# Altium PCB OFP_SCM_v1.6.PcbDoc (part 1 of 3)
Units mil, origin at the board's own origin, x right, y up, seen from the top; angles counter-clockwise.
Board outline 4724.41 x 4330.71 mil, 2 copper layers (Top Layer, Bottom Layer), stack 62.256 mil thick; 103 components, 84 nets, 458 pads, 396 vias.
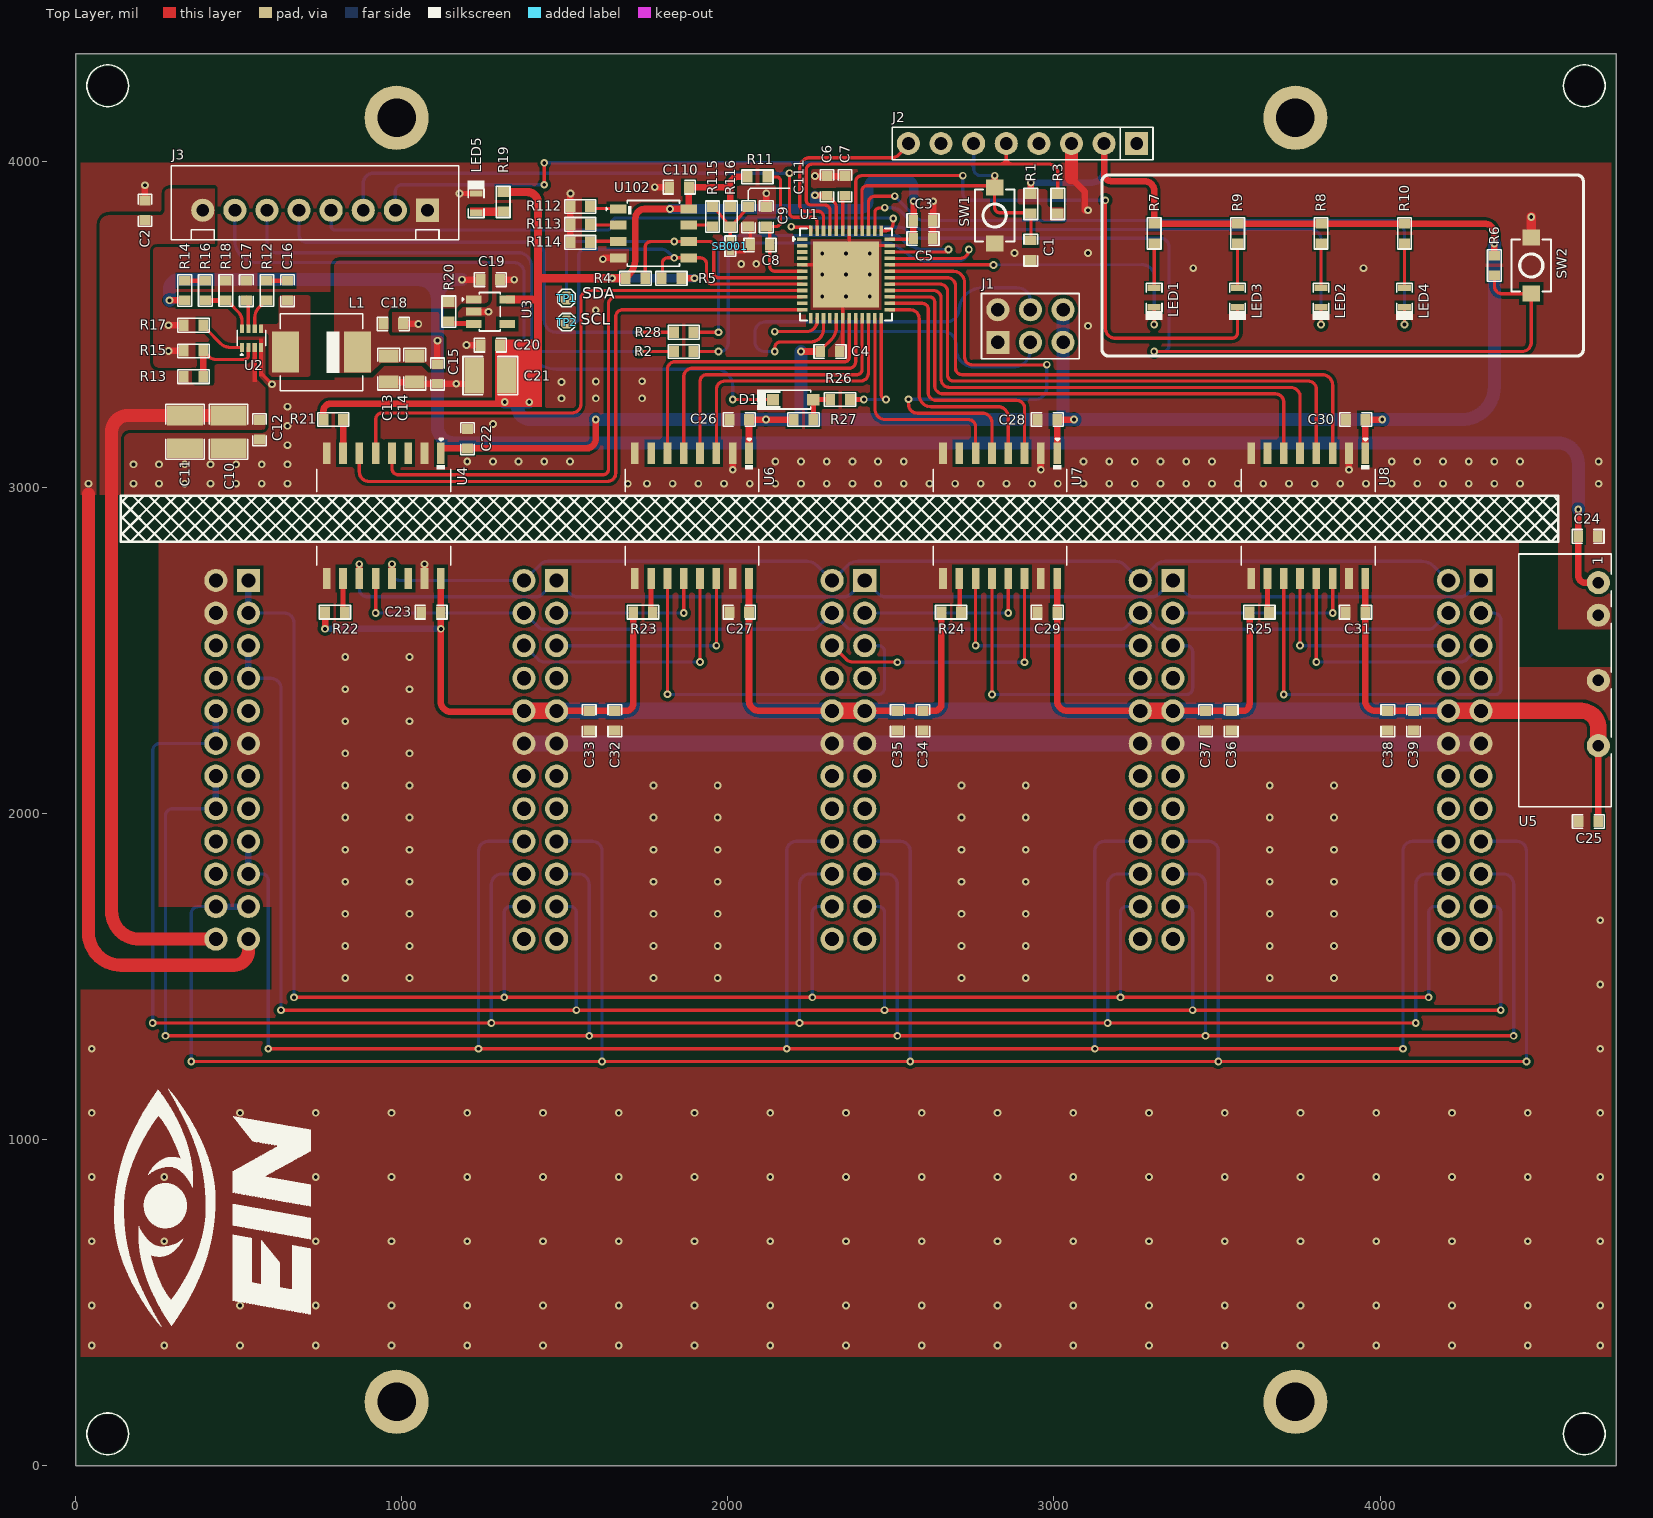
[diagram p0: Top Layer view]
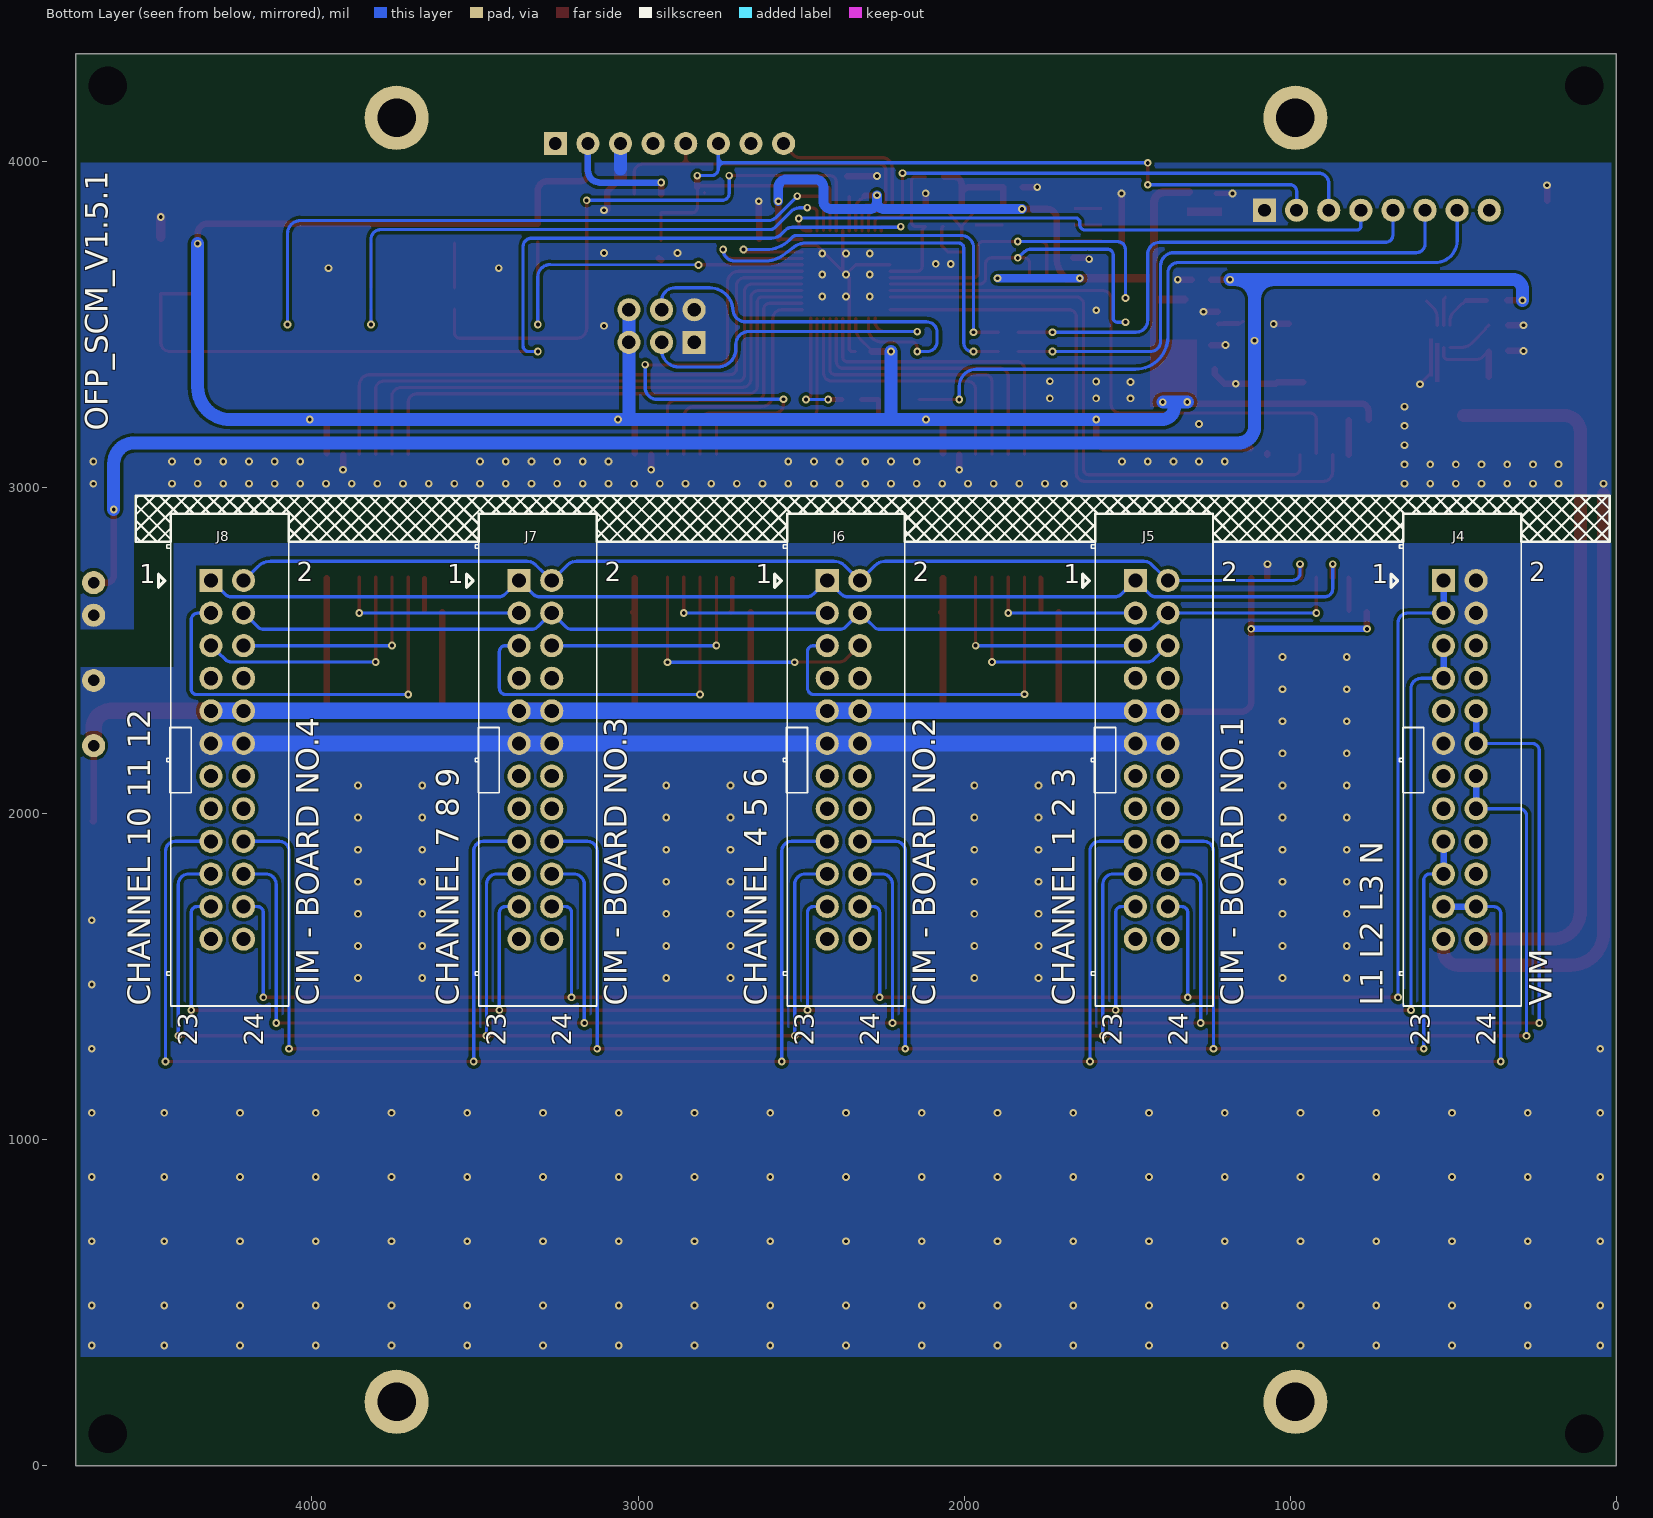
[diagram p1: Bottom Layer view, seen from below]
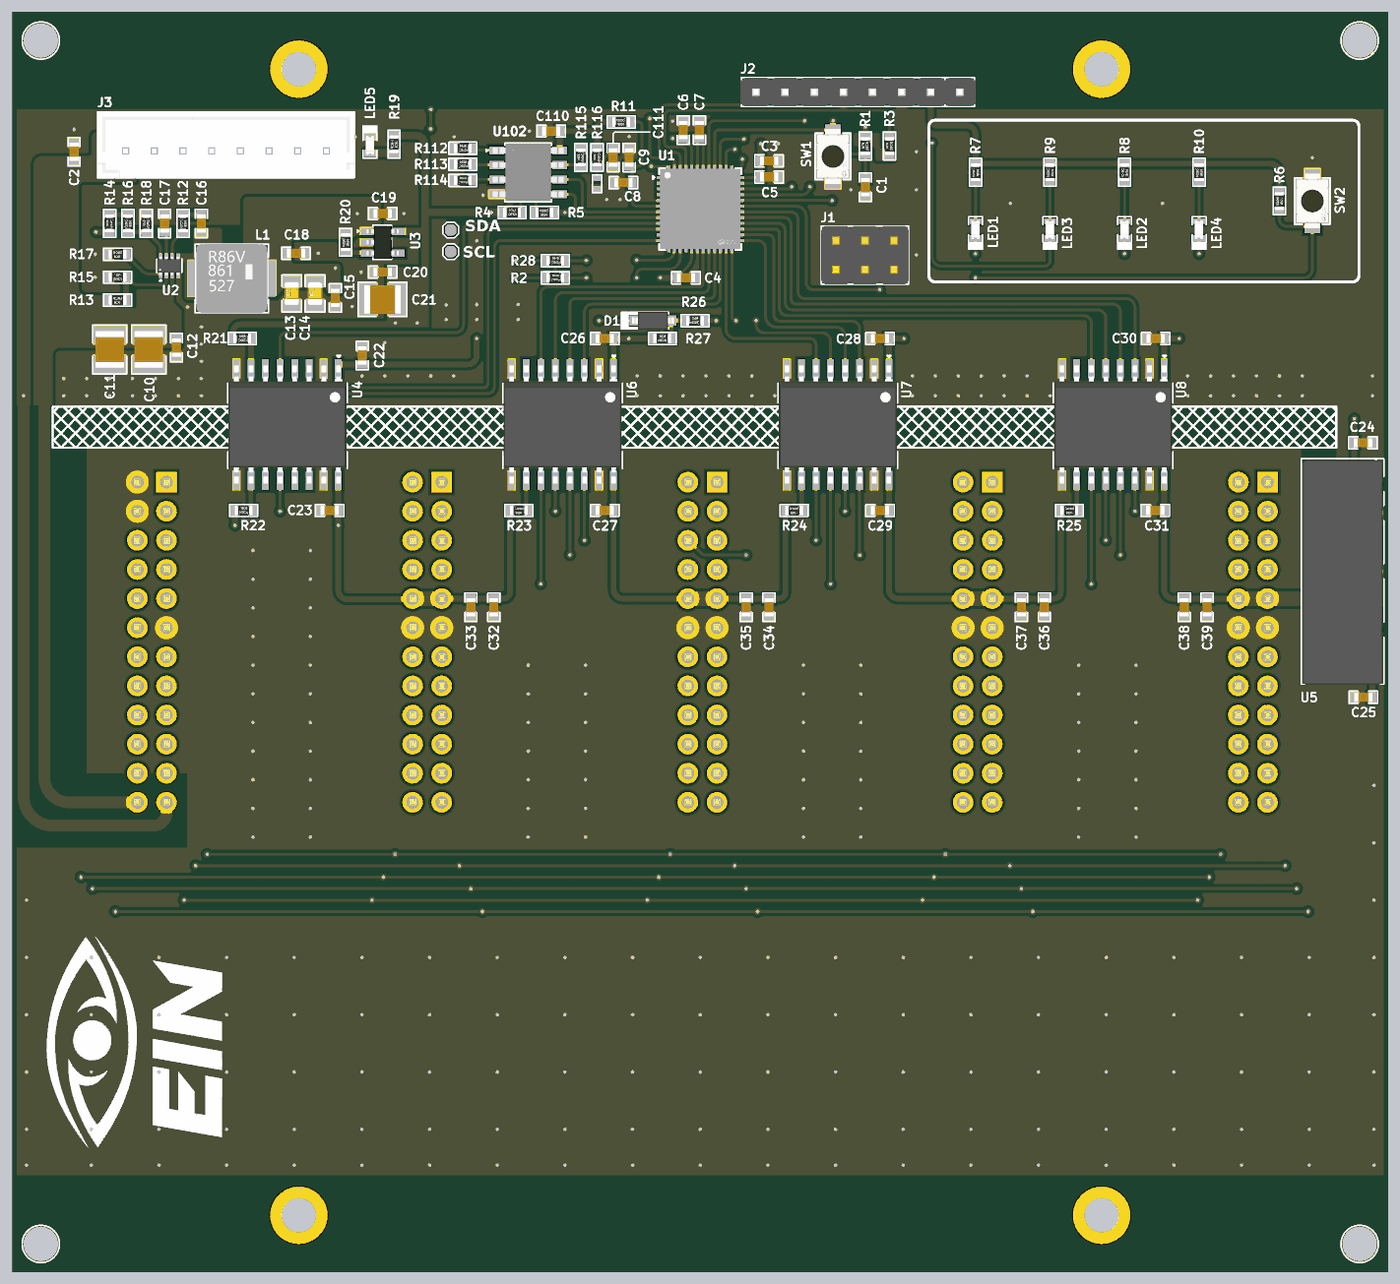
[diagram p3: 3D render of the assembled board from above, using the file's embedded part models]
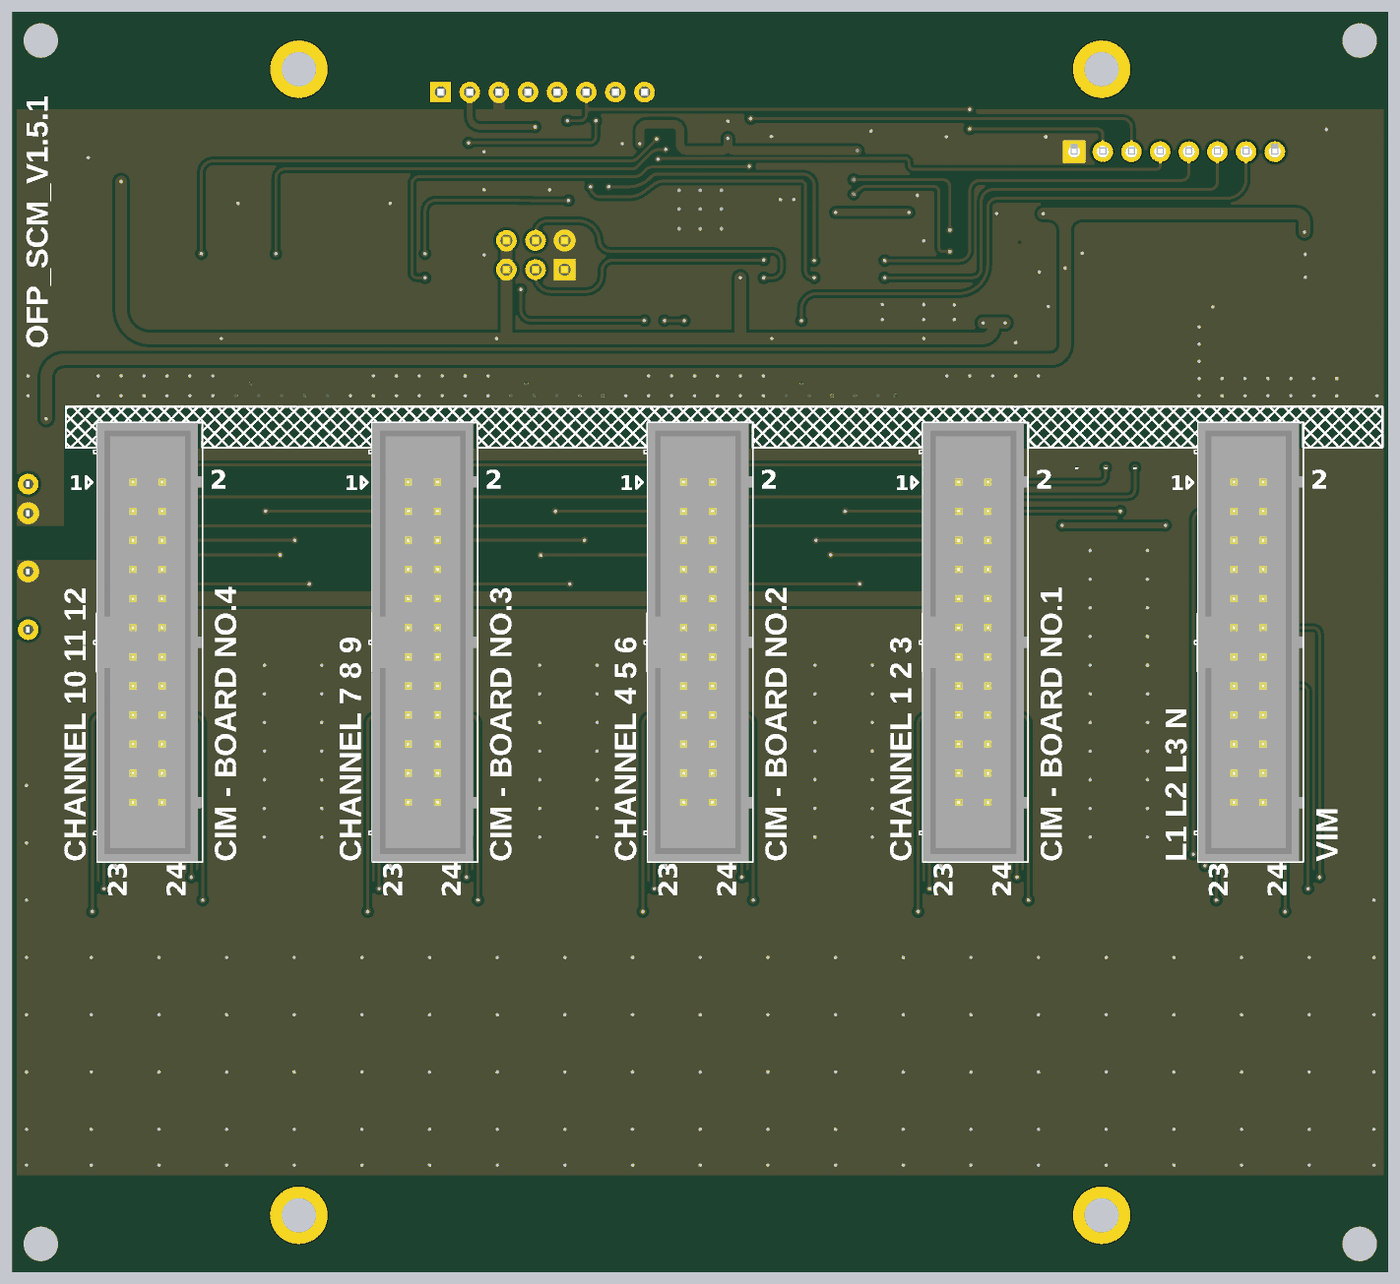
[diagram p4: 3D render of the assembled board from below, using the file's embedded part models]

## Layer stack, top to bottom
Top Solder: solder mask 0.4, Solder Resist, Dk 3.5
Top Layer: signal copper 1.378
Dielectric 1: dielectric 59.5, FR-4, Dk 4.8
Bottom Layer: signal copper 1.378
Bottom Solder: solder mask 0.4, Solder Resist, Dk 3.5

## Board outline
0,0 0,4330.71 4724.41,4330.71 4724.41,0

## Design rules (kind name [scope] priority, off if disabled: settings)
BoardOutlineClearance [All] p1: gap=0 ignorepadtopadclearanceinfootprint=FALSE except(15: Poly-OutlineEdge)
Clearance [All] p1: gap=10 ignorepadtopadclearanceinfootprint=FALSE except(6: SMDPad-SMDPad; 7: Arc-Arc Arc-Track Arc-SMDPad Arc-THPad Arc-Fill Track-Track Track-SMDPad Track-THPad Track-Fill SMDPad-Fill Fill-Fill)
ComponentClearance [All] p1: gap=0 collisioncheckmode=3 verticalgap=0 showdistances=FALSE
HoleSize [All] p1: absolutevalues=TRUE maxlimit=1000 minlimit=1 maxpercent=80.000 minpercent=20.000
HoleToHoleClearance [All] p1: gap=0 allowstackedmicrovias=TRUE
MinimumSolderMaskSliver [All] p1: minsoldermaskwidth=0
PolygonConnect [All] p1: connectstyle=Direct reliefconductorwidth=10 reliefentries=4 polygonreliefangle="90 Angle" airgapwidth=10
RoutingVias [All] p1: holewidth=11.81 width=23.62 viastyle="Through Hole" minholewidth=11.81 minwidth=23.62 maxholewidth=27.56 maxwidth=47.24
ShortCircuit "ShortCircuit - No NET" [InNet('No Net')] p1: allowed=TRUE
SilkToSilkClearance [All] p1: silktosilkclearance=0
SilkToSolderMaskClearance [IsPad] p1: minsilkscreentomaskgap=0 clearancetoexposedcopper=TRUE
SolderMaskExpansion [All] p1: expansion=4 istentingtop=FALSE
SupplyNets "Schematic Supply Nets_46" [InNet('VCORE')] p1: voltage=0.000
SupplyNets "Schematic Supply Nets_45" [InNet('GND')] p2: voltage=0.000
SupplyNets "Schematic Supply Nets_44" [InNet('VDD')] p3: voltage=0.000
SupplyNets "Schematic Supply Nets_43" [InNet('VDDA')] p4: voltage=0.000
SupplyNets "Schematic Supply Nets_42" [InNet('+5V')] p5: voltage=0.000
SupplyNets "Schematic Supply Nets_41" [InNet('VIN+')] p6: voltage=0.000
SupplyNets "Schematic Supply Nets_33" [InNet('VA_P')] p7: voltage=0.000
SupplyNets "Schematic Supply Nets_29" [InNet('VB_P')] p8: voltage=0.000
SupplyNets "Schematic Supply Nets_24" [InNet('VB_N')] p9: voltage=0.000
SupplyNets "Schematic Supply Nets_23" [InNet('VC_N')] p10: voltage=0.000
SupplyNets "Schematic Supply Nets_19" [InNet('VC_P')] p11: voltage=0.000
SupplyNets "Schematic Supply Nets_7" [InNet('VA_N')] p12: voltage=0.000
SupplyNets "Schematic Supply Nets_4" [InNet('NGND')] p13: voltage=0.000
SupplyNets "Schematic Supply Nets_1" [InNet('+3V3')] p14: voltage=0.000
Width [All] p1: maxlimit=100 minlimit=8 preferedwidth=15 minimp=50.000000 maximp=50.000000 favimp=50.000000
23 further rules are at their usual default settings.

## Classes and differential pairs
component class Power-Sheet: C10 C11 C12 C13 C14 C15 C16 C17 C18 C19 C20 C21 L1 LED5 R12 R13 R14 R15 R16 R17 R18 R19 R20 U2 U3
component class Microcontroller-Sheet: C1 C2 C3 C4 C5 C6 C7 C8 C9 D1 J1 J2 J3 LED1 LED2 LED3 LED4 R1 R2 R3 R4 R5 R6 R7 R8 R9 R10 R11 R26 R27 R28 SW1 SW2 TP1 TP2 U1
component class Isolation-Sheet: C22 C23 C24 C25 C26 C27 C28 C29 C30 C31 R21 R22 R23 R24 R25 U4 U5 U6 U7 U8
component class Board-Connectors: C32 C33 C34 C35 C36 C37 C38 C39 J4 J5 J6 J7 J8

## Components (designator, comment, footprint, x,y, rotation, side; value= is the part's Value field where it differs from the comment)
C1 "10uF" Cap-0603 2929.13,3728.35 r90 top locked
C2 "10uF" Cap-0603 212.6,3850.39 r270 top locked
C3 "10uF" Cap-0603 2598.42,3818.9 r180 top locked
C4 "0.1uF" Cap-0603 2313.15,3417.32 r180 top value=100nF
C5 "0.1uF" Cap-0603 2598.42,3763.78 r180 top locked value=100nF
C6 "0.1uF" Cap-0603 2303.96,3925.2 r270 top value=100nF
C7 "1uF" Cap-0603 2359.08,3925.2 r270 top
C8 "0.1uF" Cap-0603 2098.42,3744.09 r0 top locked value=100nF
C9 "10uF" Cap-0603 2118.11,3830.71 r270 top locked
C10 "10uF" Cap-1210 469.17,3171.1 r90 top locked
C11 "10uF" Cap-1210 335,3171.1 r90 top locked
C12 "0.1uF" Cap-0603 564,3177.1 r90 top value=100nF
C13 "22uF" Cap-0805 959.88,3363.39 r90 top locked
C14 "22uF" Cap-0805 1039.88,3363.39 r90 top locked
C15 "0.1uF" Cap-0603 1109.49,3348.27 r90 top locked value=100nF
C16 "0.1uF" Cap-0603 649.61,3604.17 r90 top locked value=100nF
C17 "33nF" Cap-0603 523.62,3604.17 r270 top locked
C18 "10uF" Cap-0603 974.25,3501.81 r180 top locked
C19 "0.1uF" Cap-0603 1271.65,3637.8 r180 top locked value=100nF
C20 "0.1uF" Cap-0603 1271.65,3437.01 r0 top locked value=100nF
C21 "100uF" Cap-1210 1271.65,3343.2 r0 top locked
C22 "0.1uF" Cap-0603 1201.65,3150 r270 top value=100nF
C23 "0.1uF" Cap-0603 1089.88,2618.11 r0 top value=100nF
C24 "10uF" Cap-0603 4637.61,2850.39 r180 top
C25 "4.7uF" Cap-0603 4638.73,1976.38 r0 top locked
C26 "0.1uF" Cap-0603 2034.76,3208.66 r0 top value=100nF
C27 "0.1uF" Cap-0603 2034.76,2618.11 r0 top locked value=100nF
C28 "0.1uF" Cap-0603 2979.65,3208.66 r0 top locked value=100nF
C29 "0.1uF" Cap-0603 2979.65,2618.11 r0 top locked value=100nF
C30 "0.1uF" Cap-0603 3925.53,3208.66 r0 top locked value=100nF
C31 "0.1uF" Cap-0603 3924.53,2618.11 r0 top locked value=100nF
C32 "10uF" Cap-0603 1653.54,2285.35 r90 top
C33 "0.1uF" Cap-0603 1574.8,2285.35 r90 top value=100nF
C34 "10uF" Cap-0603 2598.42,2285.35 r90 top
C35 "0.1uF" Cap-0603 2519.68,2285.35 r90 top value=100nF
C36 "10uF" Cap-0603 3543.31,2285.35 r90 top
C37 "0.1uF" Cap-0603 3464.57,2285.35 r90 top value=100nF
C38 "10uF" Cap-0603 4023.62,2285.35 r90 top
C39 "0.1uF" Cap-0603 4102.36,2285.35 r90 top value=100nF
C110 "0.1uF" Cap-0603 1850.39,3921.26 r180 top locked value=100nF (schematic designator C8)
C111 "0.1uF" Cap-0603 2062.99,3830.71 r270 top locked value=100nF (schematic designator C8)
D1 "1N5819HW-7-F" SOD-123 2200,3270 r180 top
J1 "X6521WV-2x03H-C60D30" X6521WV-2x03H-C60D30 2927.76,3495.37 r0 top
J2 "X6511WV-08H-C60D30" "HDR 1x8 TH male" 2903.54,4055.12 r180 top locked
J3 "B8B-XH-A(LF)(SN)" B8B-XH-A(LF)(SN) 734.25,3850.39 r180 top locked
J4 "X9555WV-2x12-6TV01" X9555WV-2x12-6TV01 479.92,2165.35 r270 bottom locked
J5 "X9555WV-2x12-6TV01" X9555WV-2x12-6TV01 1424.8,2165.35 r270 bottom locked
J6 "X9555WV-2x12-6TV01" X9555WV-2x12-6TV01 2369.68,2165.35 r270 bottom locked
J7 "X9555WV-2x12-6TV01" X9555WV-2x12-6TV01 3314.57,2165.35 r270 bottom locked
J8 "X9555WV-2x12-6TV01" X9555WV-2x12-6TV01 4259.45,2165.35 r270 bottom locked
L1 "6.8uH" ETQP3M6R8KVN 753.97,3415.2 r0 top locked value=45.6mR
LED1 "Blue" LED-0603 3307.09,3582.68 r270 top locked
LED2 "Blue" LED-0603 3818.9,3582.68 r270 top locked
LED3 "Blue" LED-0603 3562.99,3582.68 r270 top locked
LED4 "Blue" LED-0603 4074.8,3582.68 r270 top locked
LED5 "RED" LED-0603 1228.35,3872.2 r90 top locked
R1 "10K" Res-0603 2929.13,3870.08 r270 top locked
R2 "0R" Res-0603 1864.67,3417.32 r180 top
R3 "1K" Res-0603 3011.81,3870.08 r270 top locked
R4 "4.7K" Res-0603 1716.54,3641.73 r180 top locked
R5 "4.7K" Res-0603 1826.77,3641.73 r0 top locked
R6 "1K" Res-0603 4350.39,3681.1 r90 top locked
R7 "680R" Res-0603 3307.09,3779.53 r90 top locked
R8 "680R" Res-0603 3818.9,3779.53 r90 top locked
R9 "680R" Res-0603 3562.99,3779.53 r90 top locked
R10 "680R" Res-0603 4074.8,3779.53 r90 top locked
R11 "0R" Res-0603 2090.55,3952.76 r0 top
R12 "0R" Res-0603 586.61,3604.17 r90 top locked
R13 "511K" Res-0603 361.65,3340.39 r0 top locked value=511kR
R14 "49.9R" Res-0603 334.65,3604.17 r270 top locked
R15 "88.7K" Res-0603 361.65,3419.13 r180 top locked value=88.7kR
R16 "10.2K" Res-0603 397.64,3604.17 r90 top locked
R17 "0R" Res-0603 361.65,3497.87 r0 top locked
R18 "53.6K" Res-0603 460.63,3604.17 r270 top locked value=53.6kR
R19 "680R" Res-0603 1311.02,3876.2 r90 top locked
R20 "100K" Res-0603 1144.48,3539.37 r90 top value=100kR
R21 "4.7K" Res-0603 789.88,3208.66 r180 top locked
R22 "4.7K" Res-0603 794.88,2618.11 r180 top locked
R23 "4.7K" Res-0603 1739.76,2618.11 r0 top locked
R24 "4.7K" Res-0603 2684.65,2618.11 r0 top locked
R25 "4.7K" Res-0603 3629.53,2618.11 r0 top locked
R26 "0R" Res-0603 2344.08,3270 r180 top
R27 "10K" Res-0603 2232,3208.66 r180 top
R28 "1K" Res-0603 1864.67,3476.38 r180 top
R112 "4.7K" Res-0603 1547.24,3862.2 r180 top locked (schematic designator R4)
R113 "4.7K" Res-0603 1547.24,3807.08 r180 top locked (schematic designator R4)
R114 "4.7K" Res-0603 1547.24,3751.97 r180 top locked (schematic designator R4)
R115 "4.7K" Res-0603 1952.76,3830.71 r270 top locked (schematic designator R4)
R116 "4.7K" Res-0603 2007.88,3830.71 r270 top locked (schematic designator R4)
SB001 "Comment" "Solder Bridge 0402" 2007.88,3740.36 r270 top
SW1 "TS-1088-AR02016" TS-1088-AR02016 2817.83,3834.21 r270 top
SW2 "TS-1088-AR02016" TS-1088-AR02016 4463.5,3681.1 r270 top locked
TP1 "TEST POINT 0.5mm Dia" "Test-point - 0.5mm" 1505.4,3581.33 r180 top locked
TP2 "TEST POINT 0.5mm Dia" "Test-point - 0.5mm" 1505.4,3507.32 r180 top locked
U1 "ATSAMD20G17A-MU" "48-QFN (7x7)" 2362.2,3653.54 r0 top locked
U2 "TPS62933DRLR" SOT-583 539.37,3458.5 r90 top locked
U3 "RT9080-33GJ5" TSOT-23-5 1272.16,3539.37 r0 top locked
U4 "ISO7741DWR" SOIC-16-300mil 944.88,2913.39 r270 top locked
U5 "B0503S-2WR3" B0503S-2WR3 4669.29,2458.66 r270 top locked
U6 "ISO7740DWR" SOIC-16-300mil 1889.76,2913.39 r270 top locked
U7 "ISO7740DWR" SOIC-16-300mil 2834.65,2913.39 r270 top locked
U8 "ISO7740DWR" SOIC-16-300mil 3779.53,2913.39 r270 top locked
U102 "Comment" SOP-8 1771.65,3779.53 r0 top locked

## Footprints (in the part's own frame and the unit in brackets; to place one, negate y for a bottom-side part, rotate by r counter-clockwise, add the part's x,y. Pads: shape width x height; smd on the part's side, far side on the other; paste and mask are expansions set on the pad)
"48-QFN (7x7)" [mm]
  rect 0.79x0.28 smd paste-100 mask+0.051: 1(-3.407,2.75) 2(-3.407,2.25) 3(-3.407,1.75) 4(-3.407,1.25) 5(-3.407,0.75) 6(-3.407,0.25) 7(-3.407,-0.25) 8(-3.407,-0.75) 9(-3.407,-1.25) 10(-3.407,-1.75) 11(-3.407,-2.25) 12(-3.407,-2.75) 25(3.407,-2.75) 26(3.407,-2.25) 27(3.407,-1.75) 28(3.407,-1.25) 29(3.407,-0.75) 30(3.407,-0.25) 31(3.407,0.25) 32(3.407,0.75) 33(3.407,1.25) 34(3.407,1.75) 35(3.407,2.25) 36(3.407,2.75)
  rect 0.28x0.79 smd paste-100 mask+0.051: 13(-2.75,-3.407) 14(-2.25,-3.407) 15(-1.75,-3.407) 16(-1.25,-3.407) 17(-0.75,-3.407) 18(-0.25,-3.407) 19(0.25,-3.407) 20(0.75,-3.407) 21(1.25,-3.407) 22(1.75,-3.407) 23(2.25,-3.407) 24(2.75,-3.407) 37(2.75,3.407) 38(2.25,3.407) 39(1.75,3.407) 40(1.25,3.407) 41(0.75,3.407) 42(0.25,3.407) 43(-0.25,3.407) 44(-0.75,3.407) 45(-1.25,3.407) 46(-1.75,3.407) 47(-2.25,3.407) 48(-2.75,3.407)
  rect 5.15x5.15 smd paste-100 mask+0.051: 49(0,0)
  silkscreen extent -4.12,-3.58 3.58,3.58, body extent -3.5,-3.5 3.5,3.5, height 1
B8B-XH-A(LF)(SN) [mm]
  rect 1.8x1.8 hole 1: 1(-8.75,0)
  round 1.8 hole 1: 2(-6.25,0) 3(-3.75,0) 4(-1.25,0) 5(1.25,0) 6(3.75,0) 7(6.25,0) 8(8.75,0)
  silkscreen extent -11.2,-3.47 11.2,2.28, body extent -11.2,-3.47 11.2,2.28, height 7
B0503S-2WR3 [mm]
  round 1.8 hole 0.9 paste-2539.97 mask+0.05: 1(-6.35,0) 2(-3.81,0) 4(1.27,0) 6(6.35,0)
  silkscreen extent -8.58,-6.2 11.12,1, body extent -8.45,-6.08 11.15,0.92, height 10
Cap-0603 [mil]
  rect 30x35 smd mask+2.36: 1(-30,0) 2(30,0)
  silkscreen extent -49,-21 49,21, body extent -32,-16 31,16, height 34
Cap-0805 [mil] "SMD 0805"
  rect 40x60 smd mask+2.76: 1(-40,0) 2(40,0)
  silkscreen extent -64,-34 64,34, body extent -39,-25 39,25, height 30
Cap-1210 [mil] "SMD 1210"
  rect 60x110 smd: 1(-50,0) 2(50,0)
  silkscreen extent -84,-59 84,59, body extent -63,-49 63,49, height 39
ETQP3M6R8KVN [mm]
  rect 2.1x3.2 smd paste+0 mask+0.051: 1(-2.8,0) 2(2.8,0)
  silkscreen extent -3.2,-3 3.2,3, body extent -3.2,-3 3.2,3.01, height 3
"HDR 1x8 TH male" [mm]
  rect 1.8x1.8 hole 1 paste-2539.97 mask+0.051: 1(-8.89,0)
  round 1.8 hole 1 paste-2539.97 mask+0.051: 2(-6.35,0) 3(-3.81,0) 4(-1.27,0) 5(1.27,0) 6(3.81,0) 7(6.35,0) 8(8.89,0)
  silkscreen extent -10.16,-1.27 10.16,1.27, body extent -10.26,-1.25 10.27,1.25, height 8.5
LED-0603 [mm]
  rect 0.5x1 smd: 1(-0.75,0) 2(0.75,0)
  silkscreen extent -1.12,-0.66 1.75,0.66, body extent -0.82,-0.37 0.82,0.36, height 0.68
Res-0603 [mil]
  rect 30x35 smd: 1(-30,0) 2(30,0)
  silkscreen extent -48,-21 48,21, body extent -31,-17 31,17, height 18
SOD-123 [mm]
  rect 0.95x0.9 smd: 1(-1.575,0) 2(1.575,0)
  silkscreen extent -1.37,-0.8 2.82,0.8, body extent -1.82,-0.78 1.83,0.78, height 1.5
SOIC-16-300mil [mm]
  rect 1.65x0.6 smd paste+0 mask+0.07: 1(-4.875,4.445) 2(-4.875,3.175) 3(-4.875,1.905) 4(-4.875,0.635) 5(-4.875,-0.635) 6(-4.875,-1.905) 7(-4.875,-3.175) 8(-4.875,-4.445) 9(4.875,-4.445) 10(4.875,-3.175) 11(4.875,-1.905) 12(4.875,-0.635) 13(4.875,0.635) 14(4.875,1.905) 15(4.875,3.175) 16(4.875,4.445)
  silkscreen extent -6,4.12 -3.61,4.78, body extent -5.15,-5.15 5.15,5.15, height 2.65
"Solder Bridge 0402" [mil]
  rect 18x25 smd mask+2.17: 1(-18.5,0) 2(18.5,0)
  silkscreen extent -32,-17 32,16
SOP-8 [mm]
  rect 1.3x0.7 smd: 1(-2.75,1.905) 2(-2.75,0.635) 3(-2.75,-0.635) 4(-2.75,-1.905) 5(2.75,-1.905) 6(2.75,-0.635) 7(2.75,0.635) 8(2.75,1.905)
  silkscreen extent -3.69,-2.57 2.03,2.57, body extent -3.1,-2.5 3.1,2.5, height 1.76
SOT-583 [mm]
  rect 0.67x0.32 smd mask+0.055: 1(-0.735,0.75) 2(-0.735,0.25) 3(-0.735,-0.25) 4(-0.735,-0.75) 5(0.735,-0.75) 6(0.735,-0.25) 7(0.735,0.25) 8(0.735,0.75)
  silkscreen extent -1.32,-1.1 0.6,1.1, body extent -0.8,-1.05 0.8,1.05, height 0.6
"Test-point - 0.5mm" [mm]
  oct 1x1 smd: 1(0,0)
  silkscreen extent -0.68,-0.68 0.68,0.68
TS-1088-AR02016 [mm]
  rect 1.23x1.36 smd: 1(-2.185,0) 2(2.185,0)
  silkscreen extent -2.03,-1.54 2.03,1.54, body extent -2.4,-1.45 2.4,1.45, height 1.95
TSOT-23-5 [mm]
  rect 1.22x0.62 smd: 1(-1.31,0.95) 2(-1.31,0) 3(-1.31,-0.95) 4(1.31,-0.95) 5(1.31,0.95)
  silkscreen extent -2.21,-1.5 0.76,1.5, body extent -1.4,-1.45 1.4,1.45, height 0.95
X6521WV-2x03H-C60D30 [mm]
  rect 1.8x1.8 hole 1.05 paste-2539.97 mask+0.051: 1(-2.54,-1.27)
  round 1.8 hole 1.05 paste-2539.97 mask+0.051: 2(-2.54,1.27) 3(0,-1.27) 4(0,1.27) 5(2.54,-1.27) 6(2.54,1.27)
  silkscreen extent -3.81,-2.54 3.81,2.54, body extent -3.81,-2.54 3.81,2.54, height 8.5
X9555WV-2x12-6TV01 [mm]
  rect 1.8x1.8 hole 1.1: 1(-13.97,-1.27)
  round 1.8 hole 1.1: 2(-13.97,1.27) 3(-11.43,-1.27) 4(-11.43,1.27) 5(-8.89,-1.27) 6(-8.89,1.27) 7(-6.35,-1.27) 8(-6.35,1.27) 9(-3.81,-1.27) 10(-3.81,1.27) 11(-1.27,-1.27) 12(-1.27,1.27) 13(1.27,-1.27) 14(1.27,1.27) 15(3.81,-1.27) 16(3.81,1.27) 17(6.35,-1.27) 18(6.35,1.27) 19(8.89,-1.27) 20(8.89,1.27) 21(11.43,-1.27) 22(11.43,1.27) 23(13.97,-1.27) 24(13.97,1.27)
  silkscreen extent -19.18,-5.36 19.18,4.78, body extent -19.13,-4.4 19.12,4.7, height 9.2

## Part data
C1 C2 C3 C9 C18 C24 C32 C34 C36 C38: library part GRM188Z71A106KA73D, "CAP CER 10UF 10V X7R 0603", Case/Package=345Case, LCSC Part Number=C2959727, Manufacturer=Murata, Max Operating Temperature=125°C, Min Operating Temperature=-55°C, Tolerance=10%, Voltage Rating=10V, ComponentLink1Description=https://datasheet.octopart.com/GRM188Z71A106KA73D-Murata-datasheet-165579666.pdf?src-supplier=TME, ComponentLink1URL=https://datasheet.octopart.com/GRM188Z71A106KA73D-Murata-datasheet-165579666.pdf?src-supplier=TME, Height=1mm, Item Type=Capacitor, Length=1.6mm, Manufacturer Part Number=GRM188Z71A106KA73D, Material=4241ConductorMaterial, Pricing="1=0.36, 10=0.155, 50=0.155, 100=0.104, 1000=0.094, 10000=0.065 (USD)", RoHS=Yes, RoHS Compliant=Yes, Stock=390983, Supplier=Mouser, Thickness=800um, Width=800um
C4 C5 C6 C8 C12 C15 C16 C19 C20 C22 C23 C26 C27 C28 C29 C30 C31 C33 C35 C37 C39 C110 C111: library part GCJ188R71H104KA12D, "CAP CER 0.1UF 50V X7R 0603", Case Code (Imperial)=0603, Case Code (Metric)=1608, Dielectric=X7R, LCSC Part Number=C161115, Manufacturer=Murata, Max Operating Temperature=125°C, Min Operating Temperature=-55°C, Package Quantity=1, Ratings=AEC-Q200, Tolerance=10%, Voltage Rating=50V, Case/Package=0603, ComponentLink1Description=https://datasheet.ciiva.com/135/product-135604.pdf?src-supplier=Digikey, ComponentLink1URL=https://datasheet.ciiva.com/135/product-135604.pdf?src-supplier=Digikey, ComponentLink2Description=https://datasheet.ciiva.com/26889/getdatasheetpartid-369886-26889118.pdf?src-supplier=Verical, ComponentLink2URL=https://datasheet.ciiva.com/26889/getdatasheetpartid-369886-26889118.pdf?src-supplier=Verical, ComponentLink3Description=https://datasheet.ciiva.com/135/s0717e-135605.pdf?src-supplier=Digikey, ComponentLink3URL=https://datasheet.ciiva.com/135/s0717e-135605.pdf?src-supplier=Digikey, ComponentLink4Description=https://datasheet.ciiva.com/135/s0717e-135606.pdf?src-supplier=Digikey, ComponentLink4URL=https://datasheet.ciiva.com/135/s0717e-135606.pdf?src-supplier=Digikey, ComponentLink5Description=https://datasheet.ciiva.com/16440/c03e-16440425.pdf?src-supplier=Future+Electronics, ComponentLink5URL=https://datasheet.ciiva.com/16440/c03e-16440425.pdf?src-supplier=Future+Electronics, Construction=Flat, Depth=0.8mm, Features="Soft Termination", Height=0.8mm, Item Type=Capacitors, Lead Free=5697LeadFree, Length=1.6mm, Manufacturer Part Number=GCJ188R71H104KA12D, Material=4241ConductorMaterial, Mounting Technology="Surface Mount", Packaging="Tape and Reel", Pricing="1=0.13, 10=0.056, 50=0.056, 100=0.036, 1000=0.032, 10000=0.02 (USD)", Radiation Hardening=No, RoHS=Yes, RoHS Compliant=Yes, Series=GCJ, Stock=342536, Supplier=Mouser, Termination=SMD/SMT, Thickness=0.035inch, Voltage Rating (DC)=50V, Width=0.031inch
C7: library part CC0603KRX7R9BB105, "CAP CER 1UF 50V X7R 0603", Case Code (Imperial)=0603, Case Code (Metric)=1608, Dielectric=X7R, LCSC Part Number=C559769, Manufacturer=Yageo, Max Operating Temperature=125°C, Min Operating Temperature=-55°C, Package Quantity=4000, Tolerance=10%, Voltage Rating=50V, Case/Package=0603, ComponentLink1Description=http://www.mouser.com/ds/2/447/Yageo_UPY-GP_NP0_16V-to-50V_9-358835.pdf?src-supplier=Mouser, ComponentLink1URL=http://www.mouser.com/ds/2/447/Yageo_UPY-GP_NP0_16V-to-50V_9-358835.pdf?src-supplier=Mouser, ComponentLink2Description=http://www.yageo.com/documents/recent/UPY-GPHC_X7R_6.3V-to-50V_18.pdf?src-supplier=Digikey, ComponentLink2URL=http://www.yageo.com/documents/recent/UPY-GPHC_X7R_6.3V-to-50V_18.pdf?src-supplier=Digikey, ComponentLink3Description=https://datasheet.octopart.com/CC0603KRX7R9BB105-Yageo-datasheet-137700082.pdf?src-supplier=Future+Electronics, ComponentLink3URL=https://datasheet.octopart.com/CC0603KRX7R9BB105-Yageo-datasheet-137700082.pdf?src-supplier=Future+Electronics, Halogen Free=5694HalogenFree, Height=900um, Item Type=Capacitors, Lead Free="Lead Free", Length=0.063inch, Manufacturer Part Number=CC0603KRX7R9BB105, Material=4241ConductorMaterial, Mounting Technology="Surface Mount", Packaging="Tape and Reel", RoHS=Yes, RoHS Compliant=Yes, Series=CC, Stock=950, Supplier=Rs, Termination=SMD/SMT, Thickness=0.035inch, Voltage Rating (DC)=50V, Weight=7.1E-05oz, Width=0.031inch
C10 C11: library part GRM32ER71H106KA12L, "CAP CER 10UF 50V X7R 1210", LCSC Part Number=C77102, Manufacturer=Murata, ComponentLink1Description=https://datasheet.ciiva.com/16497/product-16497010.pdf?src-supplier=Future+Electronics, ComponentLink1URL=https://datasheet.ciiva.com/16497/product-16497010.pdf?src-supplier=Future+Electronics, ComponentLink2Description=https://datasheet.ciiva.com/3777/4286grm32er71h106ka1223-3777306.pdf?src-supplier=Arrow+Electronics, ComponentLink2URL=https://datasheet.ciiva.com/3777/4286grm32er71h106ka1223-3777306.pdf?src-supplier=Arrow+Electronics, ComponentLink3Description=https://datasheet.ciiva.com/11789/0900766b80ef921d-11789081.pdf?src-supplier=Rs, ComponentLink3URL=https://datasheet.ciiva.com/11789/0900766b80ef921d-11789081.pdf?src-supplier=Rs, ComponentLink4Description=https://datasheet.ciiva.com/11607/c02e-11607596.pdf?src-supplier=Avnet, ComponentLink4URL=https://datasheet.ciiva.com/11607/c02e-11607596.pdf?src-supplier=Avnet, ComponentLink5Description=https://datasheet.ciiva.com/6270/partnumbering-e-01-6270167.pdf?src-supplier=Digikey, ComponentLink5URL=https://datasheet.ciiva.com/6270/partnumbering-e-01-6270167.pdf?src-supplier=Digikey, ComponentLink6Description=https://datasheet.ciiva.com/6270/partnumbering-e-01-6270168.pdf?src-supplier=Digikey, ComponentLink6URL=https://datasheet.ciiva.com/6270/partnumbering-e-01-6270168.pdf?src-supplier=Digikey, ComponentLink7Description=https://datasheet.ciiva.com/6270/partnumbering-e-01-6270169.pdf?src-supplier=Digikey, ComponentLink7URL=https://datasheet.ciiva.com/6270/partnumbering-e-01-6270169.pdf?src-supplier=Digikey, ComponentLink8Description=https://datasheet.ciiva.com/46441/1754714-46441340.pdf?src-supplier=Element14, ComponentLink8URL=https://datasheet.ciiva.com/46441/1754714-46441340.pdf?src-supplier=Element14, Item Type=Capacitors, Lead Free=5697LeadFree, Manufacturer Part Number=GRM32ER71H106KA12L, Pricing="1000=0.325, 2000=0.32, 3000=0.315, 4000=0.315, 5000=0.305 (USD)", RoHS=Yes, RoHS Compliant=5897YesNo, Stock=960000, Supplier="Future Electronics"
C13 C14: library part GRM21BZ71A226ME15L, "CAP CER 22UF 10V X7R 0805", LCSC Part Number=C907991, Manufacturer=Murata, Max Operating Temperature=125°C, Min Operating Temperature=-55°C, Package=0805, Supplier Part Number=490-GRM21BZ71A226ME15LCT-ND, Tolerance=20%, Voltage Rating=10V, Category="Ceramic Capacitors", ComponentLink1Description=https://datasheet.octopart.com/GRM21BZ71A226ME15L-Murata-datasheet-165579666.pdf?src-supplier=TME, ComponentLink1URL=https://datasheet.octopart.com/GRM21BZ71A226ME15L-Murata-datasheet-165579666.pdf?src-supplier=TME, ComponentLink2Description=LCSC, ComponentLink2URL=https://www.lcsc.com/product-detail/Multilayer-Ceramic-Capacitors-MLCC-SMD-SMT_Murata-Electronics-GRM21BZ71A226ME15L_C907991.html, Height=1.45mm, Item Type=Capacitor, Length=2mm, Manufacturer Part Number=GRM21BZ71A226ME15L, Material=4241ConductorMaterial, Pricing="1=0.39, 10=0.259, 50=0.191, 100=0.1556, 500=0.12282, 1000=0.10372 (USD)", RoHS=Yes, Stock=49126, Supplier=Digi-Key, Thickness=1.25mm, Width=1.25mm
C17: library part GCJ188R71H333KA12D, "CAP CER 0.033UF 50V X7R 0603", Case Code (Imperial)=0603, Case Code (Metric)=1608, Dielectric=X7R, LCSC Part Number=C2173059, Manufacturer=Murata, Max Operating Temperature=125°C, Min Operating Temperature=-55°C, Package Quantity=1, Ratings=AEC-Q200, Tolerance=10%, Voltage Rating=50V, Case/Package=0603, ComponentLink1Description=https://datasheet.ciiva.com/168/product-168891.pdf?src-supplier=Digikey, ComponentLink1URL=https://datasheet.ciiva.com/168/product-168891.pdf?src-supplier=Digikey, ComponentLink2Description=https://datasheet.ciiva.com/168/s0717e-168892.pdf?src-supplier=Digikey, ComponentLink2URL=https://datasheet.ciiva.com/168/s0717e-168892.pdf?src-supplier=Digikey, ComponentLink3Description=https://datasheet.ciiva.com/168/s0717e-168893.pdf?src-supplier=Digikey, ComponentLink3URL=https://datasheet.ciiva.com/168/s0717e-168893.pdf?src-supplier=Digikey, Depth=0.8mm, Features="Soft Termination", Item Type=Capacitors, Lead Free="Lead Free", Length=1.6mm, Manufacturer Part Number=GCJ188R71H333KA12D, Mounting Technology="Surface Mount", Packaging="Tape and Reel", Pricing="1=0.18, 10=0.072, 50=0.072, 100=0.047, 1000=0.039, 10000=0.027 (USD)", RoHS=Yes, RoHS Compliant=Yes, Series=GCJ, Stock=15481, Supplier=Mouser, Termination=SMD/SMT, Thickness=0.031inch, Voltage Rating (DC)=50V, Width=0.031inch
C21: library part CC1210MKX5R5BB107, "CAP CER 100UF 6.3V X5R 1210", Case Code (Imperial)=1210, Case Code (Metric)=3225, Dielectric=X5R, LCSC Part Number=C326605, Manufacturer=Yageo, Max Operating Temperature=85°C, Min Operating Temperature=-55°C, Tolerance=20%, Voltage Rating=6.3V, Case/Package=1210, ComponentLink1Description=http://www.mouser.com/ds/2/447/Yageo_UPY-GP_NP0_16V-to-50V_9-358835.pdf?src-supplier=Mouser, ComponentLink1URL=http://www.mouser.com/ds/2/447/Yageo_UPY-GP_NP0_16V-to-50V_9-358835.pdf?src-supplier=Mouser, ComponentLink2Description=https://www.verical.com/server-webapp/html/getDatasheet?partID=557130&src-supplier=Verical, ComponentLink2URL=https://www.verical.com/server-webapp/html/getDatasheet?partID=557130&src-supplier=Verical, ComponentLink3Description=http://www.yageo.com/documents/recent/UPY-GPHC_X5R_4V-to-50V_25.pdf?src-supplier=Digikey, ComponentLink3URL=http://www.yageo.com/documents/recent/UPY-GPHC_X5R_4V-to-50V_25.pdf?src-supplier=Digikey, ComponentLink4Description=http://www.yageo.com/documents/recent/UPY-GPHC_X5R_4V-to-50V_12.pdf?src-supplier=Avnet, ComponentLink4URL=http://www.yageo.com/documents/recent/UPY-GPHC_X5R_4V-to-50V_12.pdf?src-supplier=Avnet, Depth=2.5mm, Halogen Free="Halogen Free", Height=2.5mm, Item Type=Capacitors, Lead Free="Lead Free", Length=3.2mm, Manufacturer Part Number=CC1210MKX5R5BB107, Mounting Technology="Surface Mount", Packaging="Tape and Reel", Pricing="500=0.199, 1500=0.195, 2000=0.193, 5000=0.19, 7500=0.187 (USD)", Radiation Hardening=No, RoHS=Yes, RoHS Compliant=Yes, Series=CC, Stock=155500, Supplier="Future Electronics", Termination=SMD/SMT, Thickness=0.11inch, Voltage Rating (DC)=6.3V, Weight=0.000564oz, Width=0.098inch
C25: library part GRM188Z71A475KE15D, "CAP CER 4.7UF 10V X7R 0603", Case/Package=0603, LCSC Part Number=C913474, Manufacturer=Murata, Max Operating Temperature=125°C, Min Operating Temperature=-55°C, Tolerance=10%, Voltage Rating=10V, ComponentLink1Description=https://datasheet.octopart.com/GRM188Z71A475KE15D-Murata-datasheet-149523299.pdf?src-supplier=Newark, ComponentLink1URL=https://datasheet.octopart.com/GRM188Z71A475KE15D-Murata-datasheet-149523299.pdf?src-supplier=Newark, ComponentLink2Description=https://datasheet.octopart.com/GRM188Z71A475KE15D-Murata-datasheet-165579666.pdf?src-supplier=TME, ComponentLink2URL=https://datasheet.octopart.com/GRM188Z71A475KE15D-Murata-datasheet-165579666.pdf?src-supplier=TME, Height=950um, Item Type=Capacitors, Length=1.6mm, Manufacturer Part Number=GRM188Z71A475KE15D, Material=4241ConductorMaterial, Pricing="1=0.24, 10=0.1, 50=0.1, 100=0.063, 1000=0.055, 10000=0.041 (USD)", RoHS=Yes, RoHS Compliant=Yes, Stock=33218, Supplier=Mouser, Thickness=800um, Width=800um
D1: "DIODE SCHOTTKY 40V 1A SOD123", Average Rectified Current=1A, Capacitance=110pF, Case/Package=SOD-123-2, Forward Voltage=450mV, LCSC Part Number=C82544, Manufacturer=Diodes, Max Forward Surge Current (Ifsm)=25A, Max Operating Temperature=125°C, Max Power Dissipation=450mW, Max Repetitive Reverse Voltage (Vrrm)=40V, Max Reverse Current=50uA, Min Operating Temperature=-65°C, Package Quantity=3000, Supplier Part Number 1=1N5819HW-FDICT-ND, Category="Schottky Diodes", ComponentLink1Description=https://datasheet.ciiva.com/16303/ds30217-16303296.pdf?src-supplier=Future+Electronics, ComponentLink1URL=https://datasheet.ciiva.com/16303/ds30217-16303296.pdf?src-supplier=Future+Electronics, ComponentLink2Description=https://datasheet.ciiva.com/27092/1538419-27092484.pdf?src-supplier=Jameco, ComponentLink2URL=https://datasheet.ciiva.com/27092/1538419-27092484.pdf?src-supplier=Jameco, ComponentLink3Description=https://datasheet.ciiva.com/912/ds30217-912801.pdf?src-supplier=Digi-Key, ComponentLink3URL=https://datasheet.ciiva.com/912/ds30217-912801.pdf?src-supplier=Digi-Key, ComponentLink4Description=https://datasheet.ciiva.com/1177/ds30217-1177089.pdf?src-supplier=Element14, ComponentLink4URL=https://datasheet.ciiva.com/1177/ds30217-1177089.pdf?src-supplier=Element14, ComponentLink5Description=https://datasheet.ciiva.com/912/ds30217-912802.pdf?src-supplier=Digi-Key, ComponentLink5URL=https://datasheet.ciiva.com/912/ds30217-912802.pdf?src-supplier=Digi-Key, ComponentLink6Description=https://datasheet.ciiva.com/912/ds30217-912803.pdf?src-supplier=Digi-Key, ComponentLink6URL=https://datasheet.ciiva.com/912/ds30217-912803.pdf?src-supplier=Digi-Key, ComponentLink7Description=https://datasheet.ciiva.com/8303/ds30217-8303132.pdf?src-supplier=Avnet, ComponentLink7URL=https://datasheet.ciiva.com/8303/ds30217-8303132.pdf?src-supplier=Avnet, ComponentLink8Description=https://datasheet.ciiva.com/25919/ds30217-25919644.pdf?src-supplier=Avnet+Europe, ComponentLink8URL=https://datasheet.ciiva.com/25919/ds30217-25919644.pdf?src-supplier=Avnet+Europe, Contact Plating=Tin,Matte, Current Rating=1A, Element Configuration=Single, Forward Current=1A, Height=1.25mm, Item Type=Diode, Lead Free="Lead Free", Length=2.85mm, Manufacturer Part Number=1N5819HW-7-F, Max Reverse Voltage (DC)=40V, Number of Pins=2, Output Current=1A, Packaging="Tape and Reel", Peak Non-Repetitive Surge Current=25A, Polarity=Standard, Pricing 1="1=0.46000, 10=0.34500, 100=0.19530, 500=0.12936, 1000=0.09918 (USD)", Radiation Hardening=No, REACH SVHC="No SVHC", RoHS=Yes, RoHS Compliant=Yes, Series=-, Supplier 1=Digi-Key, Termination=SMD/SMT, Voltage Rating (DC)=40V, Weight=0.000353oz, Width=1.7mm
J1: "Gold 250V 3A Policy 2.5mm 6P -40℃~+105℃ 2.54mm Double Row Black Brass 2x3P 2.54mm Plugin,P=2.54mm Pin Headers ROHS", LCSC Part Number=C706893, Manufacturer=XKB, Package=Plugin,P=2.54mm, ComponentLink1Description=LCSC, ComponentLink1URL=https://www.lcsc.com/product-detail/Pin-Headers_XKB-Connection-X6521WV-2x03H-C60D30_C706893.html, Item Type="Male Pin Header", Manufacturer Part Number=X6521WV-2x03H-C60D30
J2: "Gold 250V 3A Square Pins 2.5mm 8P 260℃ 6mm -40℃~+105℃ 3mm 2.54mm Plugin Black Brass 2.54mm 1x8P Plugin,P=2.54mm Pin Headers ROHS", LCSC Part Number=C706880, Manufacturer=XKB, Package=Plugin,P=2.54mm, ComponentLink1Description=LCSC, ComponentLink1URL=https://www.lcsc.com/product-detail/Pin-Headers_XKB-Connection-X6511WV-08H-C60D30_C706880.html, Item Type="Male Header", Manufacturer Part Number=X6511WV-08H-C60D30
J3: "CONN HEADER VERT 8POS 2.5MM", Color=Natural, Contact Resistance=20mR, Current Rating=3A, Housing Color=White, Insulation Resistance=1GR, LCSC Part Number=C157972, Manufacturer=JST, Max Operating Temperature=85°C, Max Voltage Rating (AC)=250V, Min Operating Temperature=-25°C, ComponentLink1Description=https://datasheet.ciiva.com/11747/0900766b80826540-11747580.pdf?src-supplier=Rs, ComponentLink1URL=https://datasheet.ciiva.com/11747/0900766b80826540-11747580.pdf?src-supplier=Rs, ComponentLink2Description=https://datasheet.ciiva.com/26894/getdatasheetpartid-440408-26894817.pdf?src-supplier=Verical, ComponentLink2URL=https://datasheet.ciiva.com/26894/getdatasheetpartid-440408-26894817.pdf?src-supplier=Verical, Contact Material=Brass, Contact Plating=Tin,Lead,Copper, Contact Type="Male Pin", Depth=5.75mm, Fastening Type=Detent, Housing Material=Polyamide, Item Type="Wire to Board Connector", Lead Free=5697LeadFree, Lead Pitch=2.5mm, Length=22.4mm, Manufacturer Part Number=B8B-XH-A(LF)(SN), Max Current Rating=3A, Mounting Technology="Through Hole", Number of Contacts=8, Number of Positions=8, Number of Rows=1, Orientation=Straight, Packaging=Bulk, Pitch=2.5mm, Reach SVHC Compliant=No, RoHS=Yes, Series=XH, Stock=14940, Supplier=Rs, Termination=Press-Fit, Voltage Rating=250V, Voltage Rating (AC)=250V, Weight=28.349523g, Wire/Cable Gauge=22AWG
J4 J5 J6 J7 J8: "2x12P 24P 2 Tin 2.54mm 2.54mm 12 3A Brass Direct Insert Plugin,P=2.54mm Wire To Board Connector ROHS", LCSC Part Number=C692425, Manufacturer="XKB Connectivity", Item Type="Wire to Board Connector", Manufacturer Part Number=X9555WV-2x12-6TV01, Pricing="5=0.315, 50=0.2544, 250=0.2058, 500=0.1734, 2000=0.1589, 5000=0.1503 (USD)", RoHS=No, Supplier=LCSC
L1: library part ETQ-P3M6R8KVN, "FIXED IND 6.8UH 4.5A 50.16 MOHM", LCSC Part Number=C412310, Manufacturer=Panasonic, ComponentLink1Description=http://www.farnell.com/datasheets/2820815.pdf?src-supplier=Farnell, ComponentLink1URL=http://www.farnell.com/datasheets/2820815.pdf?src-supplier=Farnell, ComponentLink2Description=https://industrial.panasonic.com/cdbs/www-data/pdf/AGL0000/AGL0000C63.pdf?src-supplier=Digikey, ComponentLink2URL=https://industrial.panasonic.com/cdbs/www-data/pdf/AGL0000/AGL0000C63.pdf?src-supplier=Digikey, ComponentLink3Description=https://datasheet.octopart.com/ETQ-P3M6R8KVN-Panasonic-datasheet-136412728.pdf?src-supplier=Element14, ComponentLink3URL=https://datasheet.octopart.com/ETQ-P3M6R8KVN-Panasonic-datasheet-136412728.pdf?src-supplier=Element14, Item Type=Inductors, Manufacturer Part Number=ETQ-P3M6R8KVN, Pricing="1=0.84, 10=0.609, 50=0.609, 100=0.502, 1000=0.405, 10000=0.344 (USD)", RoHS=Yes, Stock=4626, Supplier=Mouser
LED1 LED2 LED3 LED4: library part NCD0603B3, "blue 0603 Light Emitting Diodes (LED) ROHS", LCSC Part Number=C158101, Manufacturer="Foshan NationStar Optoelectronics", Package=0603, ComponentLink1Description=LCSC, ComponentLink1URL=https://www.lcsc.com/product-detail/Light-Emitting-Diodes-LED_Foshan-NationStar-Optoelectronics-NCD0603B3_C158101.html, Item Type=LED, Manufacturer Part Number=NCD0603B3
LED5: library part NCD0603R3, "RED LED 0603 Light Emitting Diodes", LCSC Part Number=C3151730, Manufacturer="Foshan NationStar Optoelectronics", Package=0603, ComponentLink1Description=LCSC, ComponentLink1URL=https://www.lcsc.com/product-detail/Light-Emitting-Diodes-LED_Foshan-NationStar-Optoelectronics-NCD0603R3_C3151730.html, Item Type=LED, Manufacturer Part Number=NCD0603R3
R1 R27: library part RC0603FR-0710KL, "RES SMD 10K Ohm 1% 1/10W 0603", Case Code (Imperial)=0603, Case Code (Metric)=1608, LCSC Part Number=C98220, Manufacturer=Yageo, Max Operating Temperature=155°C, Max Power Dissipation=100mW, Min Operating Temperature=-55°C, Resistance=10kR, Resistance Tolerance=1%, Resistor Type="Thick Film", Supplier Part Number 1=311-10.0KHRCT-ND, Temperature Coefficient=100ppm/°C, Voltage Rating=75V, Voltage Rating (DC)=50V, Case/Package=0603, Category="Chip SMD Resistors", ComponentLink1Description=https://datasheet.ciiva.com/7660/38590-7660789.pdf?src-supplier=Element14, ComponentLink1URL=https://datasheet.ciiva.com/7660/38590-7660789.pdf?src-supplier=Element14, ComponentLink2Description=https://datasheet.ciiva.com/7983/443971-7983596.pdf?src-supplier=Element14, ComponentLink2URL=https://datasheet.ciiva.com/7983/443971-7983596.pdf?src-supplier=Element14, ComponentLink3Description=https://datasheet.ciiva.com/22747/443971-22747519.pdf?src-supplier=Element14, ComponentLink3URL=https://datasheet.ciiva.com/22747/443971-22747519.pdf?src-supplier=Element14, ComponentLink4Description=https://datasheet.ciiva.com/46440/1868787-46440891.pdf?src-supplier=Element14, ComponentLink4URL=https://datasheet.ciiva.com/46440/1868787-46440891.pdf?src-supplier=Element14, ComponentLink5Description=https://datasheet.ciiva.com/7746/1738695-7746239.pdf?src-supplier=Element14, ComponentLink5URL=https://datasheet.ciiva.com/7746/1738695-7746239.pdf?src-supplier=Element14, ComponentLink6Description=https://datasheet.ciiva.com/15189/getdatasheetpartid-409289-15189591.pdf?src-supplier=Verical, ComponentLink6URL=https://datasheet.ciiva.com/15189/getdatasheetpartid-409289-15189591.pdf?src-supplier=Verical, Construction=Rectangular, Depth=0.8mm, Features="Moisture Resistant", Height=0.45mm, Item Type=Resistor, Lead Free="Lead Free", Lead Pitch=0.3mm, Length=1.6mm, Manufacturer Part Number=RC0603FR-0710KL, Military Standard=Not, Number of Pins=2, Number of Terminations=2, Packaging="Tape and Reel", Power Rating=100mW, Pricing 1="1=0.10000, 10=0.02400, 100=0.00970, 1000=0.00436, 2500=0.00378 (USD)", REACH SVHC=Unknown, RoHS=Yes, RoHS Compliant=Yes, Series=RC, Size Code=0603, Stock 1=25249139, Supplier 1=Digi-Key, Termination=SMD/SMT, Tolerance=1%, Weight=7.1E-05oz, Width=0.8mm
R2 R26: library part RC0603JR-070RL, "RES 0 OHM JUMPER 1/10W 0603", Case Code (Imperial)=0603, Case Code (Metric)=1608, LCSC Part Number=C95177, Manufacturer=Yageo, Max Operating Temperature=155°C, Max Power Dissipation=100mW, Min Operating Temperature=-55°C, Package Quantity=5000, Resistance=0mR, Resistance Tolerance=5%, Resistor Type="Thick Film", Supplier Part Number 1=311-0.0GRCT-ND, Temperature Coefficient=200ppm/°C, Tolerance=1%, Voltage Rating=50V, Case/Package=0603, Category="Chip SMD Resistors", Construction=Rectangular, Contact Plating=Tin,Matte, Depth=0.8mm, Features="Moisture Resistant", Height=0.45mm, Item Type=Resistor, Lead Free="Lead Free", Length=1.6mm, Manufacturer Part Number=RC0603JR-070RL, Military Standard=Not, Number of Pins=2, Number of Terminations=2, Packaging="Tape and Reel", Power Rating=100mW, Pricing 1="1=0.10000, 10=0.01700, 25=0.01240, 50=0.00960, 100=0.00700, 250=0.00536, 500=0.00430, 1000=0.00316 (USD)", Radiation Hardening=No, Reach SVHC Compliant="No SVHC", RoHS=Yes, RoHS Compliant=Yes, Series=RC, Size Code=0603, Stock 1=18081776, Supplier 1=Digi-Key, Technology="THICK FILM", Termination=SMD/SMT, Voltage Rating (DC)=50V, Width=0.8mm
R3 R6 R28: library part RC0603FR-071KL, "RES SMD 1K OHM 1% 1/10W 0603", Case Code (Imperial)=0603, Case Code (Metric)=1608, LCSC Part Number=C22548, Manufacturer=Yageo, Max Operating Temperature=155°C, Min Operating Temperature=-55°C, Power Rating=100mW, Resistance=1kR, Supplier Part Number 1=311-1.00KHRDKR-ND, Temperature Coefficient=100ppm/°C, Tolerance=1%, Voltage Rating=50V, Case/Package=0603, ComponentLink1Description=https://www.verical.com/server-webapp/html/getDatasheet?partID=409289&src-supplier=Verical, ComponentLink1URL=https://www.verical.com/server-webapp/html/getDatasheet?partID=409289&src-supplier=Verical, ComponentLink2Description=http://documents.rs-components.com/techlib://itc_doclist_GB.htm?stockno=5048928&src-supplier=RSComponents, ComponentLink2URL=http://documents.rs-components.com/techlib://itc_doclist_GB.htm?stockno=5048928&src-supplier=RSComponents, ComponentLink3Description=http://www.yageo.com/documents/recent/PYu-RC0603_51_RoHS_L_4.pdf?src-supplier=Avnet+Europe, ComponentLink3URL=http://www.yageo.com/documents/recent/PYu-RC0603_51_RoHS_L_4.pdf?src-supplier=Avnet+Europe, ComponentLink4Description=http://www.farnell.com/datasheets/2167052.pdf?src-supplier=Element14, ComponentLink4URL=http://www.farnell.com/datasheets/2167052.pdf?src-supplier=Element14, ComponentLink5Description=http://www.farnell.com/datasheets/1868787.pdf?src-supplier=Element14, ComponentLink5URL=http://www.farnell.com/datasheets/1868787.pdf?src-supplier=Element14, ComponentLink6Description=http://www.yageo.com/documents/recent/PYu-RC_Group_51_RoHS_L_2.pdf?src-supplier=Avnet, ComponentLink6URL=http://www.yageo.com/documents/recent/PYu-RC_Group_51_RoHS_L_2.pdf?src-supplier=Avnet, ComponentLink7Description=https://www.verical.com/server-webapp/html/getDatasheet?partID=404327&src-supplier=Verical, ComponentLink7URL=https://www.verical.com/server-webapp/html/getDatasheet?partID=404327&src-supplier=Verical, ComponentLink8Description=http://www.farnell.com/datasheets/443971.pdf?src-supplier=Element14, ComponentLink8URL=http://www.farnell.com/datasheets/443971.pdf?src-supplier=Element14, Composition="Thick Film", Contact Plating=Tin,Matte, Depth=0.8mm, Height=0.45mm, Item Type=Resistor, Lead Free="Lead Free", Length=1.6mm, Manufacturer Part Number=RC0603FR-071KL, Military Standard=Not, Packaging="Tape and Reel", Pricing 1="1=0.1, 10=0.023, 100=0.0094, 1000=0.0042, 2500=0.0037 (USD)", Radiation Hardening=No, REACH SVHC="No SVHC", Stock 1=21472395, Supplier 1=Digi-Key, Termination=SMD/SMT
R4 R5 R21 R22 R23 R24 R25 R112 R113 R114 R115 R116: library part RC0603FR-074K7L, "RES SMD 4.7K OHM 1% 1/10W 0603", LCSC Part Number=C99782, Manufacturer=Yageo, Package=0603, ComponentLink7Description=LCSC, ComponentLink7URL=https://www.lcsc.com/product-detail/Chip-Resistor-Surface-Mount_YAGEO-RC0603FR-074K7L_C99782.html, Item Type=Resistor, Manufacturer Part Number=RC0603FR-074K7L
R7 R8 R9 R10 R19: library part RC0603FR-07680RL, "RES SMD 680 OHM 1% 1/10W 0603", LCSC Part Number=C112310, Manufacturer=Yageo, Package=0603, ComponentLink4Description=LCSC, ComponentLink4URL=https://www.lcsc.com/product-detail/Chip-Resistor-Surface-Mount_YAGEO-RC0603FR-07680RL_C112310.html, Item Type=Resistor, Manufacturer Part Number=RC0603FR-07680RL
R11 R12 R17: library part RC0603FR-070RL, "RES SMD 0R, 1%, 0.1W, 0603", LCSC Part Number=C100044, Manufacturer=Yageo, Package=0603, ComponentLink9Description=LCSC, ComponentLink9URL=https://www.lcsc.com/product-detail/Chip-Resistor-Surface-Mount_YAGEO-RC0603FR-070RL_C100044.html, Item Type=Resistor, Manufacturer Part Number=RC0603FR-070RL
R13: library part RT0603BRD07511KL, "RES SMD 511K OHM 0.1% 1/10W 0603", Case Code (Imperial)=0603, Case Code (Metric)=1608, LCSC Part Number=C861454, Manufacturer=Yageo, Max Operating Temperature=155°C, Max Power Dissipation=100mW, Min Operating Temperature=-55°C, Temperature Coefficient=25ppm/°C, Tolerance=0.1%, Voltage Rating=75V, Case/Package=0603, ComponentLink1Description=https://datasheet.ciiva.com/12810/pyu-rt-1-to-0-05-rohs-l-4-12810871.pdf?src-supplier=Mouser, ComponentLink1URL=https://datasheet.ciiva.com/12810/pyu-rt-1-to-0-05-rohs-l-4-12810871.pdf?src-supplier=Mouser, Features="Moisture Resistant", Height=0.022inch, Item Type=Resistors, Length=0.063inch, Manufacturer Part Number=RT0603BRD07511KL, Number of Terminations=2, Packaging="Tape and Reel", Power Rating=100mW, Pricing="5000=0.0176, 15000=0.0172, 20000=0.0171, 50000=0.0167, 75000=0.0164 (USD)", RoHS=Yes, RoHS Compliant=Yes, Series=RT, Stock=35000, Supplier="Future Electronics", Termination=SMD/SMT, Weight=7.1E-05oz, Width=0.8mm
R14: library part RC0603FR-0749R9L, "RES 49.9 OHM 1% 1/10W 0603", Case Code (Imperial)=0603, Case Code (Metric)=1608, LCSC Part Number=C114625, Manufacturer=Yageo, Max Operating Temperature=155°C, Max Power Dissipation=100mW, Min Operating Temperature=-55°C, Resistance Tolerance=1%, Resistor Type="Thick Film", Temperature Coefficient=100ppm/°C, Voltage Rating=50V, Case/Package=0603, Category="Chip SMD Resistors", ComponentLink1Description=https://datasheet.ciiva.com/11808/0900766b80f96399-11808223.pdf?src-supplier=RSComponents, ComponentLink1URL=https://datasheet.ciiva.com/11808/0900766b80f96399-11808223.pdf?src-supplier=RSComponents, ComponentLink2Description=https://datasheet.ciiva.com/22747/443971-22747527.pdf?src-supplier=Element14, ComponentLink2URL=https://datasheet.ciiva.com/22747/443971-22747527.pdf?src-supplier=Element14, ComponentLink3Description=https://datasheet.ciiva.com/15189/getdatasheetpartid-325421-15189750.pdf?src-supplier=Verical, ComponentLink3URL=https://datasheet.ciiva.com/15189/getdatasheetpartid-325421-15189750.pdf?src-supplier=Verical, Construction=Rectangular, Depth=0.8mm, Features="Moisture Resistant", Height=0.45mm, Item Type=Resistor, Lead Free="Lead Free", Length=1.6mm, Manufacturer Part Number=RC0603FR-0749R9L, Military Standard=Not, Number of Pins=2, Number of Terminations=2, Packaging="Tape and Reel", Power Rating=100mW, Pricing 1="5000=0.00280 (USD)", REACH SVHC="No SVHC", Resistance=49.9R, RoHS=Yes, RoHS Compliant=Yes, Series=RC, Size Code=0603, Stock 1=2075000, Supplier 1="Arrow Electronics", Supplier Part Number 1=RC0603FR-0749R9L, Technology="THICK FILM", Termination=SMD/SMT, Tolerance=1%, Voltage Rating (DC)=50V
R15: library part RT0603BRD0788K7L, "RES SMD 88.7KOHM 0.1% 1/10W 0603", Case Code (Imperial)=0603, Case Code (Metric)=1608, LCSC Part Number=C728599, Manufacturer=Yageo, Max Operating Temperature=155°C, Max Power Dissipation=100mW, Min Operating Temperature=-55°C, Temperature Coefficient=25ppm/°C, Tolerance=0.1%, Voltage Rating=75V, Voltage Rating (DC)=50V, Case/Package=0603, ComponentLink1Description=https://datasheet.ciiva.com/12702/pyu-rt-1-to-0-05-rohs-l-4-12702687.pdf?src-supplier=Mouser, ComponentLink1URL=https://datasheet.ciiva.com/12702/pyu-rt-1-to-0-05-rohs-l-4-12702687.pdf?src-supplier=Mouser, Item Type=Resistors, Lead Free=5697LeadFree, Manufacturer Part Number=RT0603BRD0788K7L, Number of Terminations=2, Packaging="Tape and Reel", Power Rating=100mW, Pricing="5000=0.0186, 15000=0.0181, 20000=0.018, 50000=0.0177, 75000=0.0173 (USD)", RoHS=Yes, RoHS Compliant=Yes, Series=RT, Stock=5000, Supplier="Future Electronics", Termination=SMD/SMT
R16: library part RT0603BRE0710K2L, "RES SMD 10.2KOHM 0.1% 1/10W 0603", LCSC Part Number=C705802, Manufacturer=Yageo, ComponentLink1Description=https://datasheet.ciiva.com/2584/pyu-rt-1-to-0-05-rohs-l-5-2584166.pdf?src-supplier=Digikey, ComponentLink1URL=https://datasheet.ciiva.com/2584/pyu-rt-1-to-0-05-rohs-l-5-2584166.pdf?src-supplier=Digikey, Item Type=Resistors, Manufacturer Part Number=RT0603BRE0710K2L, Pricing="1=0.14, 10=0.106, 50=0.0826, 100=0.0734, 500=0.0561, 1000=0.04998 (USD)", RoHS=Yes, Stock=23436, Supplier=Digikey
R18: library part RT0603BRD0753K6L, "RES SMD 53.6KOHM 0.1% 1/10W 0603", Case Code (Imperial)=0603, Case Code (Metric)=1608, LCSC Part Number=C861467, Manufacturer=Yageo, Max Operating Temperature=155°C, Max Power Dissipation=100mW, Min Operating Temperature=-55°C, Package Quantity=5000, Temperature Coefficient=25ppm/°C, Tolerance=0.1%, Voltage Rating=75V, Voltage Rating (DC)=50V, Case/Package=0603, ComponentLink1Description=https://datasheet.ciiva.com/12799/pyu-rt-1-to-0-05-rohs-l-4-12799848.pdf?src-supplier=Mouser, ComponentLink1URL=https://datasheet.ciiva.com/12799/pyu-rt-1-to-0-05-rohs-l-4-12799848.pdf?src-supplier=Mouser, ComponentLink2Description=https://datasheet.ciiva.com/46635/pyu-rt-1-to-0-05-rohs-l-5-46635002.pdf?src-supplier=Digikey, ComponentLink2URL=https://datasheet.ciiva.com/46635/pyu-rt-1-to-0-05-rohs-l-5-46635002.pdf?src-supplier=Digikey, ComponentLink3Description=https://datasheet.ciiva.com/2585/pyu-rt-1-to-0-05-rohs-l-4-2585995.pdf?src-supplier=Digikey, ComponentLink3URL=https://datasheet.ciiva.com/2585/pyu-rt-1-to-0-05-rohs-l-4-2585995.pdf?src-supplier=Digikey, Height=0.022inch, Item Type=Resistors, Lead Free="Lead Free", Length=0.063inch, Manufacturer Part Number=RT0603BRD0753K6L, Number of Terminations=2, Packaging="Tape and Reel", Power Rating=100mW, Pricing="1=0.12, 10=0.094, 50=0.0846, 100=0.0755, 500=0.05202, 1000=0.04794 (USD)", RoHS=Yes, RoHS Compliant=Yes, Series=RT, Stock=7280, Supplier=Digikey, Termination=SMD/SMT, Weight=7.1E-05oz, Width=0.8mm
R20: library part RC0603FR-07100KL, "RES 100K OHM 1% 1/10W 0603", Case Code (Imperial)=0603, Case Code (Metric)=1608, LCSC Part Number=C14675, Manufacturer=Yageo, Max Operating Temperature=155°C, Max Power Dissipation=100mW, Min Operating Temperature=-55°C, Package Quantity=5000, Resistance Tolerance=1%, Resistor Type="Thick Film", Supplier Part Number=2424020, Temperature Coefficient=100ppm/°C, Voltage Rating=50V, Case/Package=0603, Category="Chip SMD Resistors", ComponentLink1Description=https://datasheet.ciiva.com/11819/0900766b80f96399-11819227.pdf?src-supplier=Rs, ComponentLink1URL=https://datasheet.ciiva.com/11819/0900766b80f96399-11819227.pdf?src-supplier=Rs, ComponentLink2Description=https://datasheet.ciiva.com/2455/pyu-r-int-thick-7-2455183.pdf?src-supplier=Digikey, ComponentLink2URL=https://datasheet.ciiva.com/2455/pyu-r-int-thick-7-2455183.pdf?src-supplier=Digikey, ComponentLink3Description=https://datasheet.ciiva.com/2455/pyu-r-int-thick-7-2455184.pdf?src-supplier=Digikey, ComponentLink3URL=https://datasheet.ciiva.com/2455/pyu-r-int-thick-7-2455184.pdf?src-supplier=Digikey, ComponentLink4Description=https://datasheet.ciiva.com/2455/pyu-r-int-thick-7-2455182.pdf?src-supplier=Digikey, ComponentLink4URL=https://datasheet.ciiva.com/2455/pyu-r-int-thick-7-2455182.pdf?src-supplier=Digikey, Construction=Rectangular, Depth=0.8mm, Features="Moisture Resistant", Height=0.45mm, Item Type=Resistors, Lead Free=5697LeadFree, Length=1.6mm, Manufacturer Part Number=RC0603FR-07100KL, Military Standard=Not, Mounting Technology="Surface Mount", Number of Terminations=2, Packaging="Tape and Reel", Pins=2, Power Rating=100mW, Reach SVHC Compliant=No, RoHS=Yes, RoHS Compliant=Yes, Series=RC, Stock=27300, Supplier=Rs, Technology="THICK FILM", Termination=SMD/SMT, Tolerance=1%, Voltage Rating (DC)=50V, Weight=7.1E-05oz, Width=0.8mm
SW1 SW2: "Without bracket 50mA 4mm 100000 Times 12V 160gf 3mm 2mm Round Button Standing paste SPST SMD Tactile Switches ROHS", LCSC Part Number=C720477, Manufacturer=XUNPU, Package=SMD, ComponentLink1Description=LCSC, ComponentLink1URL=https://www.lcsc.com/product-detail/Tactile-Switches_XUNPU-TS-1088-AR02016_C720477.html?s_z=n_TS-1088-AR02016, Item Type="Tactile Switch", Manufacturer Part Number=TS-1088-AR02016
TP1 TP2: "Test Point ON", Item Type="Test Point", Manufacturer Part Number="TEST POINT 0.5mm Dia"
U1: "IC MCU 32BIT 128KB FLASH 48QFN", LCSC Part Number=C1343519, Manufacturer=Microchip, ComponentLink1Description=https://datasheet.ciiva.com/29989/atmel-42129-sam-d20-datasheet-29989946.pdf?src-supplier=Avnet, ComponentLink1URL=https://datasheet.ciiva.com/29989/atmel-42129-sam-d20-datasheet-29989946.pdf?src-supplier=Avnet, Item Type=IC, Manufacturer Part Number=ATSAMD20G17A-MU, Pricing="416=2.217 (USD)", RoHS=Yes, Supplier="Arrow Electronics"
U2: "IC REG BUCK ADJ 3A SOT583", LCSC Part Number=C3200405, Manufacturer="Texas Instruments", Supplier Part Number=595-TPS62933DRLR, Category="Voltage Regulators - Switching", Item Type=IC, Manufacturer Part Number=TPS62933DRLR, Pricing="1=0.7, 10=0.581, 50=0.581, 100=0.44, 1000=0.297, 10000=0.241 (USD)", RoHS=No, Stock=5259, Supplier=Mouser